# Altium PCB NB2DSK01.PcbDoc (part 14 of 17)
Units mil, origin at the board's own origin, x right, y up, seen from the top; angles counter-clockwise.
Board outline 11815 x 6500.03 mil, 8 copper layers (Top Layer, MidLayer1, MidLayer2, GND, PWR, MidLayer3, MidLayer4, Bottom Layer), stack 74.62 mil thick; 798 components, 1002 nets, 3927 pads, 3182 vias.
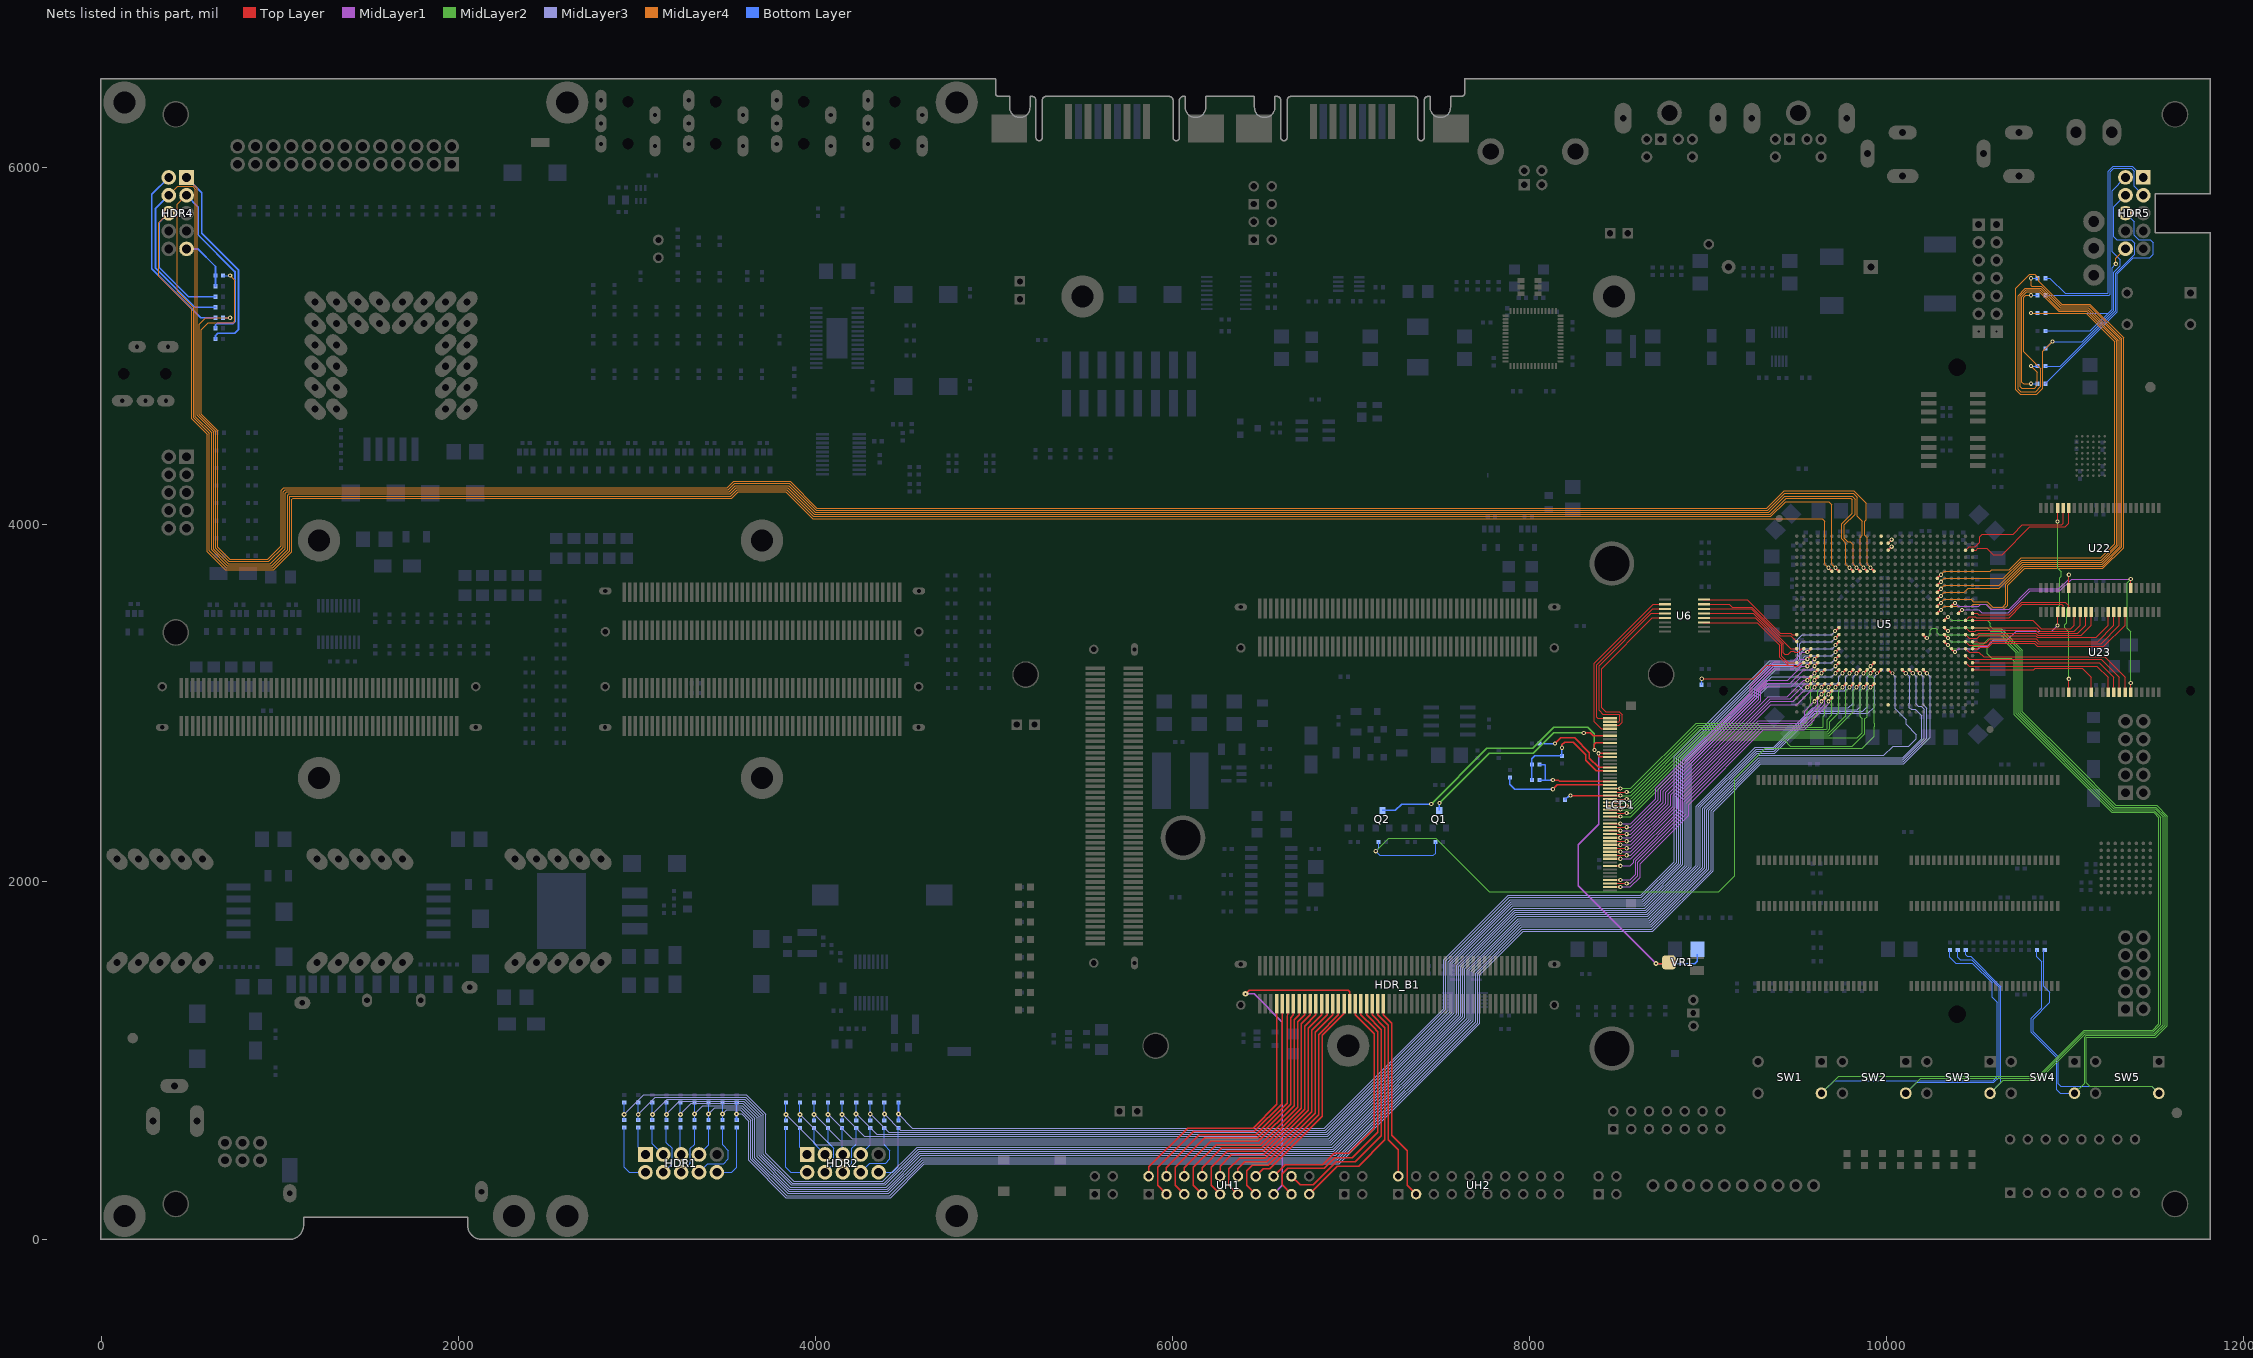
[diagram p20: the nets of this part, all layers, seen from the top]

## Via types
v1: diameter 23.62, hole 11.81, Top Layer to Bottom Layer, tented both sides, 1950 vias
v2: diameter 27.56, hole 11.81, Top Layer to Bottom Layer, tented both sides, 679 vias
v3: diameter 23.62, hole 11.81, Top Layer to Bottom Layer, 194 vias
v4: diameter 31.5, hole 11.81, Top Layer to Bottom Layer, tented both sides, 178 vias
v5: diameter 21.65, hole 11.81, Top Layer to Bottom Layer, tented both sides, 67 vias
v6: diameter 23.62, hole 11.81, Top Layer to Bottom Layer, tented bottom, 53 vias
v7: diameter 26, hole 11.81, Top Layer to Bottom Layer, tented both sides, 21 vias
v8: diameter 26, hole 11.81, Top Layer to Bottom Layer, 13 vias
v9: diameter 28, hole 11.81, Top Layer to Bottom Layer, 8 vias
v10: diameter 25.59, hole 11.81, Top Layer to Bottom Layer, tented both sides, 7 vias
v11: diameter 39.37, hole 11.81, Top Layer to Bottom Layer, tented both sides, 5 vias
v12: diameter 30, hole 11.81, Top Layer to Bottom Layer, 3 vias
v13: diameter 30, hole 11.81, Top Layer to Bottom Layer, tented both sides, 2 vias
v14: diameter 23, hole 11.81, Top Layer to Bottom Layer, tented both sides, 1 vias
v15: diameter 26.56, hole 11.81, Top Layer to Bottom Layer, tented both sides, 1 vias

## Nets (pads, with @x,y where several pads share a name; then routed paths per layer and width w, separated by ;. In a path a pad name is that pad's centre, name@x,y a point inside that pad or via, vN(x,y) a via of type N, cw(c..) or ccw(c..) an arc to the next point about the centre after c; other vN are vias at no path point) (continued)
SRAM.D19: U5.Y26 U23.10 | length 772.5
  Top Layer w5: U5.Y26@10480.32,3188.98 10543.31,3188.98 10562.99,3188.98 10822.83,3188.98 10830.71,3196.85 11094.49,3196.85 11145.67,3145.67 U23.10@11145.67,3062.99
SRAM.D20: U5.W25 U23.13 | length 916.1
  Top Layer w5: U5.W25@10440.95,3228.35 10460.63,3208.66 10543.31,3208.66 10562.99,3208.66 11177.17,3208.66 11240.16,3145.67 U23.13@11240.16,3062.99
SRAM.D21: U5.W26 U23.14 | length 908.3
  Top Layer w5: U5.W26@10480.32,3228.35 10543.31,3228.35 10562.99,3228.35 11188.98,3228.35 11271.66,3145.67 U23.14@11271.65,3062.99
SRAM.D22: U5.V25 U23.15 | length 997
  Top Layer w5: U5.V25@10440.95,3267.72 10462.5,3246.16 10541.44,3246.16 10543.31,3248.03 10562.99,3248.03 11200.79,3248.03 11303.15,3145.67 U23.15@11303.15,3062.99
SRAM.D23: U5.U25 U23.16 | length 1043.2
  Top Layer w5: U5.U25@10440.95,3307.09 10460.63,3287.4 10516.39,3287.4 10543.34,3260.45 11219.86,3260.45 11334.65,3145.67 U23.16@11334.65,3062.99
SRAM.D24: U5.U26 U23.29 | length 998.3
  Top Layer w5: U5.U26@10480.32,3307.09 10507.87,3307.09 10515.75,3314.96 10567.6,3314.96 10590.09,3337.45 10824.72,3337.45 10843.27,3318.9 11216.54,3318.9 11334.65,3437.01 U23.29@11334.65,3511.81
SRAM.D25: U5.T25 U23.30 | length 1001.4
  Top Layer w5: U5.T25@10440.95,3346.46 10460.63,3326.77 10543.31,3326.77 10562.99,3326.77 10565.27,3326.77 10585.95,3347.45 10832.44,3347.45 10845.24,3334.65 11200.79,3334.65 11303.15,3437.01 U23.30@11303.15,3511.81
SRAM.D26: U5.T26 U23.31 | length 922.6
  Top Layer w5: U5.T26@10480.32,3346.46 10507.87,3346.46 10515.75,3338.58 10543.31,3338.58 10556.81,3338.58 10579.68,3361.45 10837.06,3361.45 10852.06,3346.46 11181.1,3346.46 11271.65,3437.01 U23.31@11271.65,3511.81
SRAM.D27: U5.R25 U23.32 | length 918
  Top Layer w5: U5.R25@10440.95,3385.83 10460.63,3366.14 10507.87,3366.14 10519.69,3377.95 10543.31,3377.95 10562.99,3377.95 10834.65,3377.95 10842.52,3370.08 11173.23,3370.08 11240.16,3437.01 U23.32@11240.16,3511.81
SRAM.D28: U5.R26 U23.35 | length 771.1
  Top Layer w5: U5.R26@10480.32,3385.83 10507.87,3385.83 10515.75,3393.7 10543.31,3393.7 10562.99,3393.7 10834.65,3393.7 10846.46,3381.89 11090.55,3381.89 11145.67,3437.01 U23.35@11145.67,3511.81
SRAM.D29: U5.P25 U23.36 | length 782.3
  Top Layer w5: U5.P25@10440.95,3425.2 10460.63,3405.51 10496.06,3405.51 10500,3409.45 10543.31,3409.45 10562.99,3409.45 10834.65,3409.45 10850.39,3393.7 11070.87,3393.7 11114.17,3437.01 U23.36@11114.17,3511.81
SRAM.D30: U5.P26 U23.37 | length 698.4
  Top Layer w5: U5.P26@10480.32,3425.2 10543.31,3425.2 10562.99,3425.2 10838.58,3425.2 10858.27,3405.51 11051.18,3405.51 11082.68,3437.01 U23.37@11082.68,3511.81
SRAM.D31: U5.N26 U23.38 | length 673.4
  Top Layer w5: U5.N26@10480.32,3464.57 10543.31,3464.57 10562.99,3464.57 10818.9,3464.57 10866.14,3417.32 11031.5,3417.32 11051.18,3437.01 U23.38@11051.18,3511.81
SRAM.NBE0: U5.C26 U22.39 | length 717
  Top Layer w5: U5.C26@10480.32,3858.27 10500,3858.27 10510.81,3869.08 10560.78,3869.08 10595.86,3834 10647,3834 10801.19,3988.19 11000,3988.19 11019.69,4007.87 U22.39@11019.69,4094.49
SRAM.NBE1: U5.C25 U22.40 | length 714.3
  Top Layer w5: U5.C25@10440.95,3858.27 10460.63,3877.95 10496.06,3877.95 10519.69,3901.58 10519.69,3933.07 10535.43,3948.82 10543.31,3948.82 10562.99,3948.82 10708.66,3948.82 10759.84,4000 10980.32,4000 10988.19,4007.87 U22.40@10988.19,4094.49
SRAM.NBE2: U5.M26 U23.39 | length 615.6
  Top Layer w5: U5.M26@10480.32,3503.94 10507.87,3503.94 10515.75,3496.06 10543.31,3496.06 10562.99,3496.06 10685.04,3496.06 10755.91,3566.93 11000,3566.93 11019.69,3547.24 U23.39@11019.69,3511.81
SRAM.NBE3: U5.N25 U23.40 | length 626.7
  Top Layer w5: U5.N25@10440.95,3464.57 10460.63,3484.25 10496.06,3484.25 10500,3480.32 10543.31,3480.32 10562.99,3480.32 10685.04,3480.32 10759.84,3555.12 10980.32,3555.12 10988.19,3547.24 U23.40@10988.19,3511.81
SRAM.NCS: U5.L23 U22.6 U23.6 | length 1535.7
  Top Layer w5: U23.6@11019.69,3062.99 v1(11019.69,3137.8) ; U22.6@11019.69,3645.67 v1(11019.69,3720.47)
  Top Layer w7.87: U5.L23@10362.2,3543.31 v1(10381.89,3562.99)
  MidLayer1 w5: v1(10381.89,3562.99) 10401.58,3543.31 10515.75,3543.31 10527.56,3555.12 10543.31,3555.12 10555.12,3555.12 10582.68,3527.56 10685.04,3527.56 10799.21,3641.73 10964.57,3641.73 11019.69,3696.85 v1(11019.69,3720.47)
  MidLayer2 w5: v1(11019.69,3137.8) 11019.69,3401.58 10996.07,3425.2 10996.07,3440.95 11007.88,3452.76 11007.88,3531.5 11019.69,3543.31 v1(11019.69,3720.47)
SRAM.NOE: U5.U23 U22.41 U23.41 | length 1413.2
  Top Layer w5: v1(10956.7,3437.01) U23.41@10956.69,3511.81 ; v1(10956.69,4019.69) U22.41@10956.69,4094.49
  Top Layer w7.87: U5.U23@10362.2,3307.09 v1(10381.89,3287.4)
  MidLayer1 w5: v1(10381.89,3287.4) 10401.58,3307.09 10515.75,3307.09 ; 10515.75,3307.09 10527.56,3318.9 10543.31,3318.9 10562.99,3318.9 10600.55,3356.45 10675.35,3356.45 10724.41,3405.51 10925.2,3405.51 v1(10956.7,3437.01)
  MidLayer2 w5: v1(10956.7,3437.01) 10956.7,3539.37 10968.51,3551.18 10968.51,3704.73 10976.38,3712.6 10976.38,3736.22 10956.69,3755.91 v1(10956.69,4019.69)
SRAM.NWE: U5.M24 U22.17 U23.17 | length 1758.9
  Top Layer w5: U23.17@11366.14,3062.99 v1(11366.14,3114.17) ; U22.17@11366.14,3645.67 v1(11366.14,3696.85)
  Top Layer w7.87: U5.M24@10401.58,3503.94 v1(10421.26,3523.62)
  MidLayer1 w5: v1(10421.26,3523.62) 10515.75,3523.62 10531.5,3507.87 10543.31,3507.87 10562.99,3507.87 10681.1,3507.87 10803.15,3629.92 10968.5,3629.92 11035.43,3696.85 v1(11366.14,3696.85)
  MidLayer2 w5: v1(11366.14,3114.17) 11366.14,3401.58 11346.46,3421.26 11346.46,3677.17 v1(11366.14,3696.85)
SW0: R153.2 SW1.3 U5.T22 | length 6921.8
  Top Layer w7.87: U5.T22@10322.83,3346.46 v1(10342.52,3326.77)
  MidLayer2 w5: SW1.3@9633.86,816.93 9730.32,913.39 10847.1,913.39 11104.62,1170.9 11489.53,1170.9 11523.62,1204.99 11523.62,2359.91 11494.23,2389.3 11260.31,2389.3 10996.06,2653.54 10712.6,2937.01 10712.6,3237.5 10698.41,3251.68 10588.75,3251.68 10562.99,3277.44 10562.99,3318.9 10543.31,3318.9 10484.25,3318.9 10472.44,3307.09 10362.21,3307.09 v1(10342.52,3326.77)
  Bottom Layer w5: SW1.3@9633.86,816.93 9704.88,887.95 10596.31,887.95 10619.61,911.25 10619.61,1326 10590.5,1355.11 10590.5,1435.17 10479.65,1546.02 10385.98,1546.02 10353.41,1578.6 R153.2@10353.41,1618.11
SW1: R154.2 SW2.3 U5.R22 | length 6013
  Top Layer w7.87: U5.R22@10322.83,3385.83 v1(10342.52,3366.14)
  MidLayer2 w5: SW2.3@10106.3,816.93 10190.95,901.58 10849.44,901.58 11108.76,1160.9 11493.67,1160.9 11535.43,1202.66 11535.43,2362.24 11498.37,2399.3 11266.06,2399.3 10724.41,2940.95 10724.41,3283.47 10646.42,3361.45 10570.12,3361.45 10543.31,3334.65 10484.25,3334.65 10472.44,3346.46 10362.21,3346.46 v1(10342.52,3366.14)
  Bottom Layer w5: SW2.3@10106.3,816.93 10167.32,877.95 10600.45,877.95 10629.61,907.11 10629.61,1410.2 10474.7,1565.11 10410.89,1565.11 10397.7,1578.3 R154.2@10397.7,1618.11
SW2: R155.1 SW3.3 U5.R19 | length 5246.7
  Top Layer w7.87: U5.R19@10204.72,3385.83 v1(10224.41,3366.14)
  MidLayer2 w5: v1(10224.41,3366.14) 10244.09,3385.83 10244.09,3409.84 10255.91,3421.65 10274.02,3421.65 10283.07,3412.6 10283.07,3396.33 10293.58,3385.83 10543.31,3385.83 10562.99,3385.83 10637.8,3385.83 10736.22,3287.4 10736.22,2944.88 11019.69,2661.42 11271.8,2409.3 11502.52,2409.3 11547.24,2364.57 11547.24,1200.33 11497.82,1150.9 11112.9,1150.9 10851.77,889.77 10651.58,889.77 SW3.3@10578.74,816.93
  Bottom Layer w5: R155.1@10441.99,1618.11 10441.99,1593.01 10451,1584 10469.95,1584 10639.61,1414.35 10639.61,877.8 SW3.3@10578.74,816.93
SW3: R156.2 SW4.3 U5.P22 | length 4865
  Top Layer w7.87: U5.P22@10322.83,3425.2 v1(10342.52,3405.51)
  MidLayer2 w5: v1(10342.52,3405.51) 10362.21,3425.2 10543.31,3425.2 10562.99,3425.2 10582.68,3405.51 10637.8,3405.51 10748.03,3295.28 10748.03,2948.82 11277.55,2419.3 11506.66,2419.3 11559.06,2366.9 11559.06,1198 11501.96,1140.9 11117.04,1140.9 11108,1131.86 11108,873.75 SW4.3@11051.18,816.93
  Bottom Layer w5: R156.2@10840.61,1618.11 10840.61,1581.82 10869,1553.42 10869,1295.8 10809.21,1236.02 10809.21,1157.69 10950.94,1015.95 10950.94,836.19 10970.2,816.93 SW4.3@11051.18,816.93
SW4: R157.1 SW5.3 U5.N22 | length 5713.7
  Top Layer w7.87: U5.N22@10322.83,3464.57 v1(10342.52,3484.25)
  MidLayer2 w5: v1(10342.52,3484.25) 10362.21,3464.57 10543.31,3464.57 10562.99,3464.57 10578.74,3448.82 10578.74,3433.07 10594.49,3417.32 10641.73,3417.32 10759.84,3299.21 10759.84,2952.76 11043.31,2669.29 11283.3,2429.3 11510.8,2429.3 11570.87,2369.23 11570.87,1195.67 11506.1,1130.9 11121.18,1130.9 11118,1127.72 11118,877 11138,857 11483.55,857 SW5.3@11523.62,816.93
  Bottom Layer w5: R157.1@10884.9,1618.11 10879,1612.21 10879,1417 10914,1382 10914,1326.66 10819.21,1231.87 10819.21,1161.83 10960.94,1020.1 10960.94,870.06 10974,857 11483.55,857 SW5.3@11523.62,816.93
TALK#.MASTER.CNCT: HDR4.9 R296.2 R302.1 | length 313.1
  Bottom Layer w10: HDR4.9@477.95,5545.67 541.46,5545.67 640.24,5446.9 R302.1@640.24,5396.06 R296.2@640.24,5337.01
TALK#.MASTER.MODE: HDR4.6 R297.1 U5.F6 | length 12558.6
  Top Layer w7.87: v1(9673.23,3759.84) U5.F6@9692.91,3740.16
  MidLayer4 w5: HDR4.6@377.95,5745.67 323,5690.72 323,5392.13 508,5207.13 508,4593.52 594.49,4507.04 594.49,3849.56 696.01,3748.03 965.26,3748.03 1067.68,3850.45 1067.68,4142.45 1074.83,4149.61 3531.5,4149.61 3566.93,4185.04 3834.65,4185.04 3984.25,4035.43 9637.8,4035.43 9653.54,4019.69 9653.54,4000 9653.54,3779.53 v1(9673.23,3759.84)
  Bottom Layer w10: HDR4.6@377.95,5745.67 323.68,5691.4 323.68,5443.45 489.18,5277.95 R297.1@640.24,5277.95
TALK#.MASTER.TCK: HDR4.3 R299.1 U5.F7 | length 13017.8
  Top Layer w7.87: v1(9712.6,3759.84) U5.F7@9732.28,3740.16
  MidLayer4 w5: HDR4.3@477.95,5845.67 427,5794.72 427,5308.14 518,5217.14 518,4600.23 606.3,4511.93 606.3,3854.45 700.9,3759.84 960.07,3759.84 1055.68,3855.45 1055.68,4159.13 1057.97,4161.42 3526.6,4161.42 3562.04,4196.85 3839.54,4196.85 3989.14,4047.24 9350.39,4047.24 9433.07,4129.92 9675.05,4129.92 9692.91,4112.06 9692.91,4019.69 9692.91,4000 9692.91,3779.53 v1(9712.6,3759.84)
  Bottom Layer w10: HDR4.3@477.95,5845.67 543.68,5779.94 543.68,5623.45 748.68,5418.45 748.68,5138.45 738.68,5128.45 648.68,5128.45 640.24,5120.01 R299.1@640.24,5100.79
TALK#.MASTER.TDI: HDR4.1 R300.1 U5.F10 | length 13456.1
  Top Layer w7.87: v1(9830.71,3759.84) U5.F10@9850.39,3740.16
  MidLayer4 w5: HDR4.1@477.95,5945.67 539,5884.62 539,4612.63 629.92,4521.71 629.92,3864.23 710.69,3783.47 947.69,3783.47 1031.68,3867.45 1031.68,4176.45 1040.27,4185.04 3516.82,4185.04 3552.25,4220.47 3849.32,4220.47 3998.93,4070.87 9338.58,4070.87 9429.17,4161.45 9806.68,4161.45 9823.68,4144.45 9823.68,4060.35 9762.68,3999.35 9762.68,3925.45 9782.02,3906.12 9794.67,3906.12 9811.02,3889.76 9811.02,3779.53 v1(9830.71,3759.84)
  Bottom Layer w5: HDR4.1@473.62,5944.88 477.95,5944.88 478.74,5944.88 HDR4.1@483.07,5944.88
  Bottom Layer w10: HDR4.1@477.95,5945.67 478.74,5944.88 563.68,5859.94 563.68,5633.45 768.68,5428.45 768.68,5093.45 748.68,5073.45 653.68,5073.45 640.24,5060.01 R300.1@640.24,5041.73
TALK#.MASTER.TDO: HDR4.2 R301.1 | length 1026.3
  Bottom Layer w5: HDR4.2@377.95,5945.67 HDR4.2@383.07,5945.67
  Bottom Layer w10: HDR4.2@377.95,5945.67 283.68,5851.4 283.68,5433.45 557.29,5159.84 R301.1@640.24,5159.84
TALK#.MASTER.TMS: HDR4.4 R298.1 U5.F9 | length 13241.1
  Top Layer w7.87: v1(9791.34,3759.84) U5.F9@9811.02,3740.16
  MidLayer4 w5: HDR4.4@377.95,5845.67 429.28,5897 512,5897 528,5881 528,4606.93 618.11,4516.82 618.11,3859.34 705.8,3771.65 955.88,3771.65 1043.82,3859.59 1043.82,4166.59 1050.46,4173.23 3521.71,4173.23 3557.14,4208.66 3844.43,4208.66 3994.04,4059.06 9346.46,4059.06 9435.85,4148.45 9798.56,4148.45 9806.68,4140.33 9806.68,4064.45 9747.17,4004.94 9747.17,3922.43 9771.65,3897.94 9771.65,3779.53 v1(9791.34,3759.84)
  Bottom Layer w10: HDR4.4@377.95,5845.67 304.48,5772.2 304.48,5437.66 523.24,5218.9 R298.1@640.24,5218.9
TALK#.SLAVE.CNCT: HDR5.10 R303.2 R309.1 | length 1147.1
  MidLayer4 w5: v1(11283,5462) 11283,5492.06 HDR5.10@11337.01,5546.06
  Bottom Layer w5: R303.2@10887.76,5086 11140.61,5086 11261.68,5207.07 11261.68,5440.68 v1(11283,5462) ; R309.1@10887.76,5186 11240.61,5186
TALK#.SLAVE.MODE: HDR5.6 R308.2 | length 1362.5
  Bottom Layer w5: R308.2@10887.76,4790.72 11291.68,5194.64 11291.68,5406.4 11380.28,5495 11472,5495 11493,5516 11493,5579 11476,5596 11411,5596 11386,5621 11386,5697.07 HDR5.6@11337.01,5746.06
TALK#.SLAVE.TCK: HDR5.3 R306.1 | length 1359.3
  Bottom Layer w5: R306.1@10887.76,5286 11247,5286 11251.68,5290.68 11251.68,5977.6 11272.13,5998.04 11369.96,5998.04 11387,5981 11387,5896.07 HDR5.3@11437.01,5846.06 HDR5.3@11436.94,5846.06
TALK#.SLAVE.TDI: HDR5.1 R305.1 | length 1304.1
  Bottom Layer w5: R305.1@10887.76,5381.27 10913,5381.27 10998.28,5296 11237,5296 11241.68,5300.68 11241.68,5981.74 11267.98,6008.04 11375.03,6008.04 HDR5.1@11437.01,5946.06
TALK#.SLAVE.TDO: HDR5.2 R304.2 U5.M21 | length 5557.9
  Top Layer w7.87: U5.M21@10283.46,3503.94 v1(10303.15,3523.62)
  MidLayer4 w5: v1(10303.15,3523.62) 10322.84,3543.31 10472.44,3543.31 10484.25,3555.12 10543.31,3555.12 10559.06,3555.12 10586.61,3527.56 10653.54,3527.56 10677.17,3551.18 10677.17,3661.42 10771.65,3755.91 11210.66,3755.91 11327,3872.25 11327,5046.71 11137.71,5236 10979.57,5236 10852,5363.57 10852,5380.52 10830,5402.52 10800.52,5402.52 10723.55,5325.55 10723.55,4756.62 10748.2,4731.97 10838.97,4731.97 10872.2,4765.2 10872.2,4971.2 v1(10927.52,5026.52)
  Bottom Layer w5: R304.2@10887.76,4987.57 v1@10927.11,5026.92 ; v1(10927.52,5026.52) 11095.27,5026.52 11271.68,5202.93 11271.68,5414.68 11308.07,5451.07 11308.07,5483.93 11261.68,5530.32 11261.68,5870.74 HDR5.2@11337.01,5946.06
TALK#.SLAVE.TMS: HDR5.4 R307.2 | length 1336.2
  Bottom Layer w5: R307.2@10887.76,4889.15 10972.05,4889.15 11281.68,5198.78 11281.68,5410.54 11388,5516.86 11388,5578 11370,5596 11289,5596 11271.68,5613.32 11271.68,5780.74 HDR5.4@11337.01,5846.06
TALK.MASTER.CNCT: R302.2 U5.F12 | length 11934.9
  Top Layer w7.87: v1(9909.45,3759.84) U5.F12@9929.13,3740.16
  MidLayer4 w5: v1(722.36,5396.06) 748.6,5369.83 748.6,5139.73 741.9,5133.03 598.88,5133.03 559,5093.15 559,4620.92 653.54,4526.37 653.54,3874.02 720.47,3807.09 933.32,3807.09 1008.68,3882.45 1008.68,4194.01 1023.33,4208.66 3507.03,4208.66 3542.47,4244.1 3859.11,4244.1 4008.71,4094.49 9328.8,4094.49 9425.76,4191.45 9816.41,4191.45 9885.83,4122.03 9885.83,4027.56 9877.95,4019.69 9877.95,4000 9877.95,3940.95 9889.76,3929.13 9889.76,3779.53 v1(9909.45,3759.84)
  Bottom Layer w5: R302.2@682.6,5396.06 v1(722.36,5396.06)
TALK.MASTER.TDO: R301.2 U5.F11 | length 11663.6
  Top Layer w7.87: v1(9870.08,3759.84) U5.F11@9889.76,3740.16
  MidLayer4 w5: v1(722.36,5159.84) 585.86,5159.84 562.99,5136.97 549,5122.98 549,4616.78 641.73,4524.04 641.73,3869.12 715.58,3795.28 939.5,3795.28 1019.68,3875.45 1019.68,4185.45 1031.08,4196.85 3511.93,4196.85 3547.36,4232.28 3854.21,4232.28 4003.82,4082.68 9333.69,4082.68 9427.47,4176.45 9812.68,4176.45 9834.68,4154.45 9834.68,4047.21 9862.2,4019.69 9862.2,4000 9862.2,3940.95 9850.39,3929.13 9850.39,3779.53 v1(9870.08,3759.84)
  Bottom Layer w5: R301.2@682.6,5159.84 v1(722.36,5159.84)
TALK.SLAVE.CNCT: R309.2 U5.G21 | length 2778.9
  Top Layer w7.87: U5.G21@10283.46,3700.79 v1(10303.15,3720.47)
  MidLayer4 w5: v1(10303.15,3720.47) 10322.84,3740.16 10543.31,3740.16 10562.99,3740.16 10578.74,3740.16 10586.61,3748.03 10685.04,3748.03 10751.97,3814.96 11199,3814.96 11277,3892.96 11277,5026 11117,5186 v1(10808,5186)
  Bottom Layer w5: v1(10808,5186) R309.2@10845.4,5186
TALK.SLAVE.MODE: R308.1 U5.H21 | length 3465
  Top Layer w7.87: U5.H21@10283.46,3661.42 v1(10303.15,3681.1)
  MidLayer4 w5: v1(10303.15,3681.1) 10322.84,3700.79 10543.31,3700.79 10562.99,3700.79 10653.54,3700.79 10755.91,3803.15 11201.33,3803.15 11287,3888.82 11287,5030.14 11121.14,5196 10963,5196 10853,5306 10784.92,5306 10757.2,5278.29 10757.2,4799.84 10766.32,4790.72 v1(10808,4790.72)
  Bottom Layer w5: v1(10808,4790.72) R308.1@10845.4,4790.72
TALK.SLAVE.TCK: R306.2 U5.K21 | length 4302.2
  Top Layer w7.87: U5.K21@10283.46,3582.68 v1(10303.15,3602.36)
  MidLayer4 w5: v1(10303.15,3602.36) 10322.84,3622.05 10433.07,3622.05 10456.69,3645.67 10543.31,3645.67 10562.99,3645.67 10629.92,3645.67 10763.78,3779.53 11205.99,3779.53 11307,3880.54 11307,5038.43 11129.43,5216 10971.28,5216 10861.28,5326 10776.63,5326 10735.2,5284.57 10735.2,4760.97 10749.2,4746.97 10833.75,4746.97 10862.2,4775.43 10862.2,4874.72 10767.2,4969.72 10767.2,5274.14 10779.06,5286 v1(10808,5286)
  Bottom Layer w5: v1(10808,5286) R306.2@10845.4,5286
TALK.SLAVE.TDI: R305.2 U5.L21 | length 3149
  Top Layer w7.87: U5.L21@10283.46,3543.31 v1(10303.15,3562.99)
  MidLayer4 w5: v1(10303.15,3562.99) 10322.84,3582.68 10472.44,3582.68 10484.25,3570.87 10543.31,3570.87 10559.06,3570.87 10562.99,3570.87 10594.49,3539.37 10649.61,3539.37 10667.17,3556.93 10667.17,3667.17 10767.72,3767.72 11208.32,3767.72 11317,3876.39 11317,5042.57 11133.57,5226 10975.43,5226 10865.43,5336 10812,5336 10808,5340 v1(10808,5381.27)
  Bottom Layer w5: v1(10808,5381.27) R305.2@10845.4,5381.27
TALK.SLAVE.TMS: R307.1 U5.J21 | length 3728.3
  Top Layer w7.87: U5.J21@10283.46,3622.05 v1(10303.15,3641.73)
  MidLayer4 w5: v1(10303.15,3641.73) 10322.84,3661.42 10543.31,3661.42 10562.99,3661.42 10629.92,3661.42 10759.84,3791.34 11203.66,3791.34 11297,3884.68 11297,5034.28 11125.28,5206 10967.14,5206 10857.14,5316 10780.77,5316 10747.2,5282.43 10747.2,4773.32 10755.33,4765.19 10827.93,4765.19 10843.75,4781.01 10843.75,4853.4 v1(10808,4889.15)
  Bottom Layer w5: v1(10808,4889.15) R307.1@10845.4,4889.15
TFT#.BLUE0: LCD1.22 U5.AB12 | length 1951.6
  Top Layer w5: LCD1.22@8448.82,2366.14 v1(8507.87,2366.14)
  Top Layer w7.87: v1(9909.45,3090.55) U5.AB12@9929.13,3110.24
  MidLayer2 w5: v1(8507.87,2366.14) 8566.93,2366.14 8996.06,2795.28 9425.2,2795.28 9460.63,2759.84 9807.09,2759.84 9877.95,2830.71 9877.95,2870.08 9877.95,2889.76 9877.95,2913.39 9889.76,2925.2 9889.76,3070.87 v1(9909.45,3090.55)
TFT#.BLUE1: LCD1.23 U5.AB11 | length 1895.8
  Top Layer w5: LCD1.23@8448.82,2385.83 v1(8543.31,2385.83)
  Top Layer w7.87: v1(9870.08,3090.55) U5.AB11@9889.76,3110.24
  MidLayer2 w5: v1(8543.31,2385.83) 8566.93,2385.83 8988.19,2807.09 9834.09,2807.09 9862.2,2835.2 9862.2,2913.39 9850.39,2925.2 9850.39,3070.87 v1(9870.08,3090.55)
TFT#.BLUE2: LCD1.24 U5.AB10 | length 1790.5
  Top Layer w5: LCD1.24@8448.82,2405.51 v1(8507.87,2405.51)
  Top Layer w7.87: v1(9830.71,3090.55) U5.AB10@9850.39,3110.24
  MidLayer2 w5: v1(8507.87,2405.51) 8566.93,2405.51 8594.49,2433.07 ; 8574.8,2413.39 8980.32,2818.9 9677.17,2818.9 9811.02,2952.76 9811.02,3070.87 v1(9830.71,3090.55)
TFT#.BLUE3: LCD1.25 U5.AB9 | length 1727.6
  Top Layer w5: LCD1.25@8448.82,2425.2 v1(8543.31,2425.2)
  Top Layer w7.87: v1(9791.34,3090.55) U5.AB9@9811.02,3110.24
  MidLayer2 w5: v1(8543.31,2425.2) 8566.93,2425.2 8972.44,2830.71 9670.94,2830.71 9771.65,2931.42 9771.65,3070.87 v1(9791.34,3090.55)
TFT#.BLUE4: LCD1.26 U5.AB8 | length 1693
  Top Layer w5: LCD1.26@8448.82,2444.88 v1(8507.87,2444.88)
  Top Layer w7.87: v1(9751.97,3090.55) U5.AB8@9771.65,3110.24
  MidLayer2 w5: v1(8507.87,2444.88) 8566.93,2444.88 8964.57,2842.52 9665.35,2842.52 9681.1,2858.27 9681.1,2870.08 9681.1,2889.76 9681.1,2897.64 9732.28,2948.82 9732.28,3070.87 v1(9751.97,3090.55)
TFT#.CL1: LCD1.29 U5.AB5 | length 1545.8
  Top Layer w5: LCD1.29@8448.82,2503.94 v1(8543.31,2503.94)
  Top Layer w7.87: v1(9633.86,3090.55) U5.AB5@9653.54,3110.24
  MidLayer2 w5: v1(8543.31,2503.94) 8566.93,2503.94 8940.95,2877.95 9574.8,2877.95 9582.68,2885.83 9582.68,2901.58 9582.68,2913.39 9614.17,2944.88 9614.17,3070.87 v1(9633.86,3090.55)
TFT#.CL2: LCD1.30 U5.Y5 | length 1611.8
  Top Layer w5: LCD1.30@8448.82,2523.62 v1(8507.87,2523.62)
  Top Layer w7.87: v1(9633.86,3169.29) U5.Y5@9653.54,3188.98
  MidLayer2 w5: v1(8507.87,2523.62) 8566.93,2523.62 8933.07,2889.76 9547.24,2889.76 9555.12,2897.64 9555.12,2913.39 9555.12,2976.38 9574.8,2996.06 9574.8,3141.73 9582.68,3149.61 9614.17,3149.61 v1(9633.86,3169.29)
TFT#.CL3: LCD1.3 U5.AC6 | length 1797
  Top Layer w5: LCD1.3@8448.82,1992.13 v1(8543.31,1992.13)
  Top Layer w7.87: v1(9673.23,3051.18) U5.AC6@9692.91,3070.87
  MidLayer1 w5: v1(8543.31,1992.13) 8562.99,1992.13 8606.3,2035.43 8606.3,2110.24 8877.95,2381.89 8877.95,2440.95 9300.46,2863.45 9532.74,2863.45 9582.68,2913.39 9582.68,2925.2 9653.54,2996.06 9653.54,3031.5 v1(9673.23,3051.18)
TFT#.DISP_ON: LCD1.2 U5.AD6 | length 1774.8
  Top Layer w5: LCD1.2@8448.82,1972.44 v1(8507.87,1972.44)
  Top Layer w7.87: v1(9673.23,3011.81) U5.AD6@9692.91,3031.5
  MidLayer1 w5: v1(8507.87,1972.44) 8562.99,1972.44 8618.11,2027.56 8618.11,2102.36 8889.76,2374.02 8889.76,2433.07 9309.15,2852.45 9537.12,2852.45 9594.49,2909.82 9594.49,2917.32 9673.23,2996.06 v1(9673.23,3011.81)
TFT#.GREEN0: LCD1.15 U5.Y4 | length 1627.8
  Top Layer w5: LCD1.15@8448.82,2228.35 v1(8543.31,2228.35)
  Top Layer w7.87: v1(9594.49,3169.29) U5.Y4@9614.17,3188.98
  MidLayer1 w5: v1(8543.31,2228.35) 8566.93,2228.35 8775.03,2436.45 8775.03,2495.5 9283.46,3003.94 9295.28,3015.75 9295.28,3066.93 9322.83,3094.49 9413.39,3094.49 9433.07,3094.49 9464.57,3094.49 9519.69,3149.61 9574.8,3149.61 v1(9594.49,3169.29)
TFT#.GREEN1: LCD1.16 U5.W4 | length 1633.7
  Top Layer w5: LCD1.16@8448.82,2248.03 v1(8507.87,2248.03)
  Top Layer w7.87: v1(9594.49,3208.66) U5.W4@9614.17,3228.35
  MidLayer1 w5: v1(8507.87,2248.03) 8566.93,2248.03 8761.11,2442.21 8761.11,2501.27 9283.46,3023.62 9283.46,3070.87 9326.77,3114.17 9413.39,3114.17 9433.07,3114.17 9460.63,3114.17 9535.43,3188.98 9574.8,3188.98 v1(9594.49,3208.66)
TFT#.GREEN2: LCD1.17 U5.W3 | length 1583.9
  Top Layer w5: LCD1.17@8448.82,2267.72 v1(8543.31,2267.72)
  Top Layer w7.87: v1(9555.12,3208.66) U5.W3@9574.8,3228.35
  MidLayer1 w5: v1(8543.31,2267.72) 8566.93,2267.72 8747.19,2447.98 8747.19,2507.04 9271.65,3031.5 9271.65,3074.8 9326.77,3129.92 9413.39,3129.92 9433.07,3129.92 9444.88,3129.92 9523.62,3208.66 v1(9555.12,3208.66)
TFT#.GREEN3: LCD1.18 U5.V4 | length 1631.4
  Top Layer w5: LCD1.18@8448.82,2287.4 v1(8507.87,2287.4)
  Top Layer w7.87: v1(9594.49,3248.03) U5.V4@9614.17,3267.72
  MidLayer1 w5: v1(8507.87,2287.4) 8566.93,2287.4 8733.27,2453.75 8733.27,2512.8 9259.84,3039.37 9259.84,3082.68 9370.08,3192.91 9413.39,3192.91 9433.07,3192.91 9480.32,3192.91 9515.75,3228.35 9574.8,3228.35 v1(9594.49,3248.03)
TFT#.GREEN4: LCD1.19 U5.V3 | length 1583.9
  Top Layer w5: LCD1.19@8448.82,2307.09 v1(8543.31,2307.09)
  Top Layer w7.87: v1(9555.12,3248.03) U5.V3@9574.8,3267.72
  MidLayer1 w5: v1(8543.31,2307.09) 8566.93,2307.09 8719.35,2459.51 8719.35,2518.57 9248.03,3047.24 9248.03,3090.55 9370.08,3212.6 9417.32,3212.6 9433.07,3212.6 9476.38,3212.6 9511.81,3248.03 v1(9555.12,3248.03)
TFT#.GREEN5: LCD1.20 U5.U3 | length 1592
  Top Layer w5: LCD1.20@8448.82,2326.77 v1(8507.87,2326.77)
  Top Layer w7.87: v1(9555.12,3287.4) U5.U3@9574.8,3307.09
  MidLayer1 w5: v1(8507.87,2326.77) 8566.93,2326.77 8705.43,2465.28 8705.43,2524.33 9236.22,3055.12 9236.22,3098.43 9371.25,3233.45 9474.02,3233.45 9527.97,3287.4 v1(9555.12,3287.4)
TFT#.LED_C_L: LCD1.45 Q1.3 | length 1164.8
  Top Layer w7.87: v1(8303.15,2834.65) 8340.55,2834.65 8356.3,2818.9 LCD1.45@8448.82,2818.9
  MidLayer2 w7.87: v1(7494.42,2442.2) 7772.69,2720.47 8021.14,2720.47 8135.31,2834.65 v1(8303.15,2834.65)
  Bottom Layer w7.87: Q1.3@7494.42,2400.86 v1(7494.42,2442.2)
TFT#.LED_C_R: LCD1.43 Q2.3 | length 1607.4
  Top Layer w7.87: v1(8362.9,2739.4) 8362.9,2772.2 8370.23,2779.53 LCD1.43@8448.82,2779.53
  MidLayer2 w7.87: v1(7449.14,2436.29) 7760.88,2748.03 8016.26,2748.03 8134.37,2866.14 8326.77,2866.14 8362.9,2830.01 v1(8362.9,2739.4)
  Bottom Layer w7.87: Q2.3@7175.52,2400.86 7248.35,2400.86 7283.79,2436.29 v1(7449.14,2436.29)
TFT#.M: C118.1 LCD1.28 U5.AB6 | length 1877.7
  Top Layer w5: LCD1.28@8448.82,2484.25 v1(8507.87,2484.25)
  Top Layer w7.87: v1(8228.35,2484.25) LCD1.28@8448.82,2484.25 ; v1(9673.23,3090.55) U5.AB6@9692.91,3110.24
  MidLayer2 w5: v1(8507.87,2484.25) 8566.93,2484.25 8948.82,2866.14 9641.73,2866.14 9645.67,2870.08 9645.67,2889.76 9645.67,2929.13 9653.54,2937.01 9653.54,3070.87 v1(9673.23,3090.55)
  Bottom Layer w5: C118.1@8197.83,2460.63 C118.1@8197.83,2461.61
  Bottom Layer w7.87: C118.1@8197.83,2461.61 8220.47,2484.25 v1(8228.35,2484.25)
TFT#.POL: LCD1.27 U5.AB7 | length 1659.3
  Top Layer w5: LCD1.27@8448.82,2464.57 v1(8543.31,2464.57)
  Top Layer w7.87: v1(9712.6,3090.55) U5.AB7@9732.28,3110.24
  MidLayer2 w5: v1(8543.31,2464.57) 8566.93,2464.57 8956.69,2854.33 9661.42,2854.33 9665.35,2858.27 9665.35,2870.08 9665.35,2889.76 9665.35,2909.45 9692.91,2937.01 9692.91,3070.87 v1(9712.6,3090.55)
TFT#.RED0: LCD1.10 U5.AD4 | length 1591.8
  Top Layer w5: LCD1.10@8448.82,2129.92 v1(8507.87,2129.92)
  Top Layer w7.87: v1(9594.49,3011.81) U5.AD4@9614.17,3031.5
  MidLayer1 w5: v1(8507.87,2129.92) 8566.93,2129.92 8842.52,2405.51 8842.52,2464.57 9281.61,2903.66 9517.83,2903.66 9539.37,2925.2 9539.37,2956.69 v1(9594.49,3011.81)
TFT#.RED1: LCD1.11 U5.AB4 | length 1597.9
  Top Layer w5: LCD1.11@8448.82,2149.61 v1(8543.31,2149.61)
  Top Layer w7.87: v1(9594.49,3090.55) U5.AB4@9614.17,3110.24
  MidLayer1 w5: v1(8543.31,2149.61) 8566.93,2149.61 8830.71,2413.39 8830.71,2472.44 9350.39,2992.13 9413.39,2992.13 9433.07,2992.13 9496.06,2992.13 v1(9594.49,3090.55)
TFT#.RED2: LCD1.12 U5.AB3 | length 1550.3
  Top Layer w5: LCD1.12@8448.82,2169.29 v1(8507.87,2169.29)
  Top Layer w7.87: v1(9555.12,3090.55) U5.AB3@9574.8,3110.24
  MidLayer1 w5: v1(8507.87,2169.29) 8566.93,2169.29 8816.79,2419.15 8816.79,2478.21 9350.39,3011.81 9413.39,3011.81 9433.07,3011.81 9476.38,3011.81 v1(9555.12,3090.55)
TFT#.RED3: LCD1.13 U5.AA4 | length 1597.9
  Top Layer w5: LCD1.13@8448.82,2188.98 v1(8543.31,2188.98)
  Top Layer w7.87: v1(9594.49,3129.92) U5.AA4@9614.17,3149.61
  MidLayer1 w5: v1(8543.31,2188.98) 8566.93,2188.98 8802.87,2424.92 8802.87,2483.97 9346.46,3027.56 9417.32,3027.56 9433.07,3027.56 9460.63,3027.56 9543.31,3110.24 9574.8,3110.24 v1(9594.49,3129.92)
TFT#.RED4: LCD1.14 U5.AA3 | length 1550.3
  Top Layer w5: LCD1.14@8448.82,2208.66 v1(8507.87,2208.66)
  Top Layer w7.87: v1(9555.12,3129.92) U5.AA3@9574.8,3149.61
  MidLayer1 w5: v1(8507.87,2208.66) 8566.93,2208.66 8788.95,2430.68 8788.95,2489.74 9336.77,3037.56 9443.07,3037.56 9535.43,3129.92 v1(9555.12,3129.92)
TFT#.STH: LCD1.8 U5.AC5 | length 1682.3
  Top Layer w5: LCD1.8@8448.82,2090.55 v1(8507.87,2090.55)
  Top Layer w7.87: v1(9633.86,3051.18) U5.AC5@9653.54,3070.87
  MidLayer1 w5: v1(8507.87,2090.55) 8562.99,2090.55 8582.68,2110.24 8582.68,2125.99 8854.33,2397.64 8854.33,2456.69 9287.09,2889.45 9519.37,2889.45 9555.12,2925.2 9555.12,2937.01 9614.17,2996.06 9614.17,3031.5 v1(9633.86,3051.18)
TFT#.STV: LCD1.4 U5.AD5 | length 1721.6
  Top Layer w5: LCD1.4@8448.82,2011.81 v1(8507.87,2011.81)
  Top Layer w7.87: v1(9633.86,3011.81) U5.AD5@9653.54,3031.5
  MidLayer1 w5: v1(8507.87,2011.81) 8562.99,2011.81 8594.49,2043.31 8594.49,2118.11 8866.14,2389.76 8866.14,2448.82 9292.78,2875.45 9525.06,2875.45 9570.87,2921.26 9570.87,2933.07 9633.86,2996.06 v1(9633.86,3011.81)
TFT#.V0: LCD1.31 R43.1 | length 618.1
  Top Layer w7.87: v1(8129.92,2519.69) 8153.54,2543.31 LCD1.31@8448.82,2543.31
  Bottom Layer w7.87: R43.1@7889.76,2585.12 7889.76,2547.24 7917.32,2519.69 v1(8129.92,2519.69)
TFT#.V4: LCD1.32 R45.2 R46.2 | length 514.2
  Top Layer w7.87: v1(8129.92,2570.87) 8161.42,2570.87 8169.29,2562.99 LCD1.32@8448.82,2562.99
  Bottom Layer w7.87: R46.2@8054.65,2570.87 v1(8129.92,2570.87) ; R45.2@8054.65,2657.48 8085.72,2657.48 8087.17,2656.03 8087.17,2572.36
TFT#.V5: C115.1 LCD1.35 R45.1 R46.1 | length 713.8
  Top Layer w7.87: v1(8181.1,2751.97) 8181.1,2767.72 8196.85,2783.47 8244.09,2783.47 8314.96,2712.6 8314.96,2681.1 8374.02,2622.05 LCD1.35@8448.82,2622.05
  Bottom Layer w7.87: R46.1@8012.28,2570.87 R45.1@8012.28,2657.48 ; R45.1@8012.28,2658.71 8012.28,2690.05 8027.95,2705.71 C115.1@8181.1,2705.71 ; C115.1@8181.1,2706.69 v1(8181.1,2751.97)
TFT#.V9: LCD1.36 R44.2 | length 487
  Top Layer w7.87: v1(8141.73,2775.59) 8173.23,2807.09 8251.97,2807.09 8334.65,2724.41 8334.65,2692.91 8385.83,2641.73 LCD1.36@8448.82,2641.73
  Bottom Layer w7.87: R44.2@8061.81,2775.59 v1(8141.73,2775.59)
TFT#.VCOM: C114.1 LCD1.39 LCD1.40 VR1.2 | length 1897.6
  Top Layer w7.87: LCD1.39@8448.82,2700.79 8389.13,2700.79 8385.83,2704.09 v1(8385.83,2720.47) LCD1.40@8448.82,2720.47 ; v2(8708.66,1543.31) 8773.37,1543.31 VR1.2@8779.53,1549.47
  MidLayer1 w7.87: v1(8385.83,2720.47) 8385.83,2322.84 8271.65,2208.66 8271.65,1980.32 v2(8708.66,1543.31)
  Bottom Layer w7.87: v2(8708.66,1543.31) 8925.31,1543.31 8939.29,1557.29 C114.1@8939.29,1595.83
TFT#.X_MINUS: LCD1.49 U6.4 | length 960.7
  Top Layer w5: LCD1.49@8448.82,2897.64 8501.66,2897.64 8505.79,2901.76 8505.79,2934.21 8500,2940 8410,2940 8388.68,2961.32 8388.68,3212.45 8680.52,3504.29 U6.4@8757.87,3504.29
TFT#.X_PLUS: LCD1.47 U6.2 | length 964.4
  Top Layer w5: LCD1.47@8448.82,2858.27 8399.61,2858.27 8361.68,2896.2 8361.68,3224.45 8692.7,3555.47 U6.2@8757.87,3555.47
TFT#.Y_MINUS: LCD1.48 U6.5 | length 942.6
  Top Layer w5: LCD1.48@8448.82,2877.95 8503.18,2877.95 8518.68,2893.45 8518.68,2937.07 8502.3,2953.45 8425.68,2953.45 8402.68,2976.45 8402.68,3193.45 8687.93,3478.7 U6.5@8757.87,3478.7
TFT#.Y_PLUS: LCD1.50 U6.3 | length 880.4
  Top Layer w5: LCD1.50@8448.82,2917.32 8382.68,2917.32 8376.1,2923.9 8376.1,3217.88 8688.11,3529.88 U6.3@8757.87,3529.88
TFT.BLIGHT: R48.1 R49.1 U5.W12 | length 4549.9
  Top Layer w7.87: v1(9909.45,3208.66) U5.W12@9929.13,3228.35
  MidLayer2 w5: v1(7138.12,2172.51) 7209.6,2244 7475,2244 7774.12,1944.88 9059.06,1944.88 9149.61,2035.43 9149.61,2578.74 9318.9,2748.03 9862.2,2748.03 9929.13,2814.96 9929.13,2870.08 9929.13,2889.77 9929.13,3138.19 9917.72,3149.61 9900,3149.61 9889.76,3159.84 9889.76,3188.98 v1(9909.45,3208.66)
  Bottom Layer w5: R49.1@7154.34,2223.69 7154.34,2188.73 v1(7138.12,2172.51) 7161.74,2148.89 7460.88,2148.89 7473.23,2161.24 R48.1@7473.23,2223.69
TFT.IRQ: R47.1 U5.W2 U6.11 | length 1257.6
  Top Layer w5: v1(8963.71,3138.47) 9254.25,3138.47 9268.24,3152.46 9328.38,3212.6 9476.38,3212.6 9480.32,3208.66 9503.94,3208.66 9523.62,3228.35 U5.W2@9535.43,3228.35 ; U6.11@8976.38,3453.11 9274.33,3453.11 9401,3326.44 9401,3259.6 9448,3212.6
  Bottom Layer w5: R47.1@8962.56,3104.06 8962.88,3104.91 R47.1@8963.04,3105.33 ; R47.1@8963.04,3104.85 R47.1@8963.04,3105.33 ; v1(8963.71,3138.47) R47.1@8963.04,3105.33
TFT_SPI.BUSY: U5.U2 U6.13 | length 699.5
  Top Layer w5: U6.13@8976.38,3504.29 9251.43,3504.29 9421,3334.72 9421,3284.59 9430,3275.59 9448.14,3275.59 9463.89,3291.34 9480.32,3291.34 9484.25,3287.4 9503.94,3287.4 9523.62,3307.09 U5.U2@9535.43,3307.09
TFT_SPI.CLK: U5.R1 U6.16 | length 600.6
  Top Layer w5: U6.16@8976.38,3581.06 8976.65,3580.79 9217.36,3580.79 9404.69,3393.45 9463.21,3393.45 9470.84,3385.83 U5.R1@9496.06,3385.83
TFT_SPI.CS_N: U5.T1 U6.15 | length 606.3
  Top Layer w5: U6.15@8976.38,3555.47 9118.41,3555.47 9134,3539.88 9244.12,3539.88 9403.55,3380.45 9462.07,3380.45 U5.T1@9496.06,3346.46
TFT_SPI.DIN: U5.U1 U6.14 | length 612
  Top Layer w5: U6.14@8976.38,3529.88 9239.98,3529.88 9462.77,3307.09 U5.U1@9496.06,3307.09
TFT_SPI.DOUT: U5.W1 U6.12 | length 662.2
  Top Layer w5: U6.12@8976.38,3478.7 9262.88,3478.7 9411,3330.58 9411,3264.35 9447,3228.35 U5.W1@9496.06,3228.35
UBA#.DETECT: HDR1.10 R261.2 | length 345.4
  Bottom Layer w5: HDR1.10@3448.03,374.02 3531.5,374.02 3559.06,401.58 R261.2@3559.06,624.49
UBA#.HARD.TCK: HDR1.3 R251.2 | length 175.9
  Bottom Layer w5: R251.2@3086.61,624.49 3086.61,535.43 HDR1.3@3148.03,474.02
UBA#.HARD.TDI: HDR1.1 R248.2 | length 167.1
  Bottom Layer w5: R248.2@3007.87,624.49 3007.87,514.17 HDR1.1@3048.03,474.02
UBA#.HARD.TDO: HDR1.2 R249.2 | length 353.2
  Bottom Layer w5: R249.2@2929.13,624.49 2929.13,401.58 2956.69,374.02 HDR1.2@3048.03,374.02
UBA#.HARD.TMS: HDR1.4 R250.2 | length 283.7
  Bottom Layer w5: HDR1.4@3148.03,374.02 3196.85,422.83 3196.85,507.87 3165.35,539.37 R250.2@3165.35,624.49
UBA#.SOFT.TCK: HDR1.7 R259.2 | length 172.7
  Bottom Layer w5: HDR1.7@3348.03,474.02 3401.57,527.56 R259.2@3401.57,624.49
UBA#.SOFT.TDI: HDR1.5 R256.2 | length 152.1
  Bottom Layer w5: R256.2@3244.09,624.49 3244.09,477.95 HDR1.5@3248.03,474.02
UBA#.SOFT.TDO: HDR1.6 R257.2 | length 281.5
  Bottom Layer w5: HDR1.6@3248.03,374.02 3299.21,425.2 3299.21,507.87 3322.83,531.5 R257.2@3322.83,624.49
UBA#.SOFT.TMS: HDR1.8 R258.2 | length 383.5
  Bottom Layer w5: HDR1.8@3348.03,374.02 3397.02,423 3485.99,423 3511.81,448.82 3511.81,496.06 3480.32,527.56 R258.2@3480.32,624.49
UBA.DETECT: R260.1 R261.1 U5.Y19 | length 8921.5
  Top Layer w7.87: U5.Y19@10204.72,3188.98 v1(10224.41,3169.29)
  MidLayer3 w5: v2(3559.06,700.79) 3586.57,700.79 3625.95,661.42 3625.95,441.22 3834.88,232.28 4421.03,232.28 4610,421.26 6933.56,421.26 7720.47,1208.17 7720.47,1480.32 7964.57,1724.41 8688.98,1724.41 9027.56,2062.99 9027.56,2393.7 9295.28,2661.42 10095.28,2661.42 10244.09,2810.24 10244.09,2889.76 10244.1,3149.6 v1(10224.41,3169.29)
  Bottom Layer w11.81: R261.1@3559.06,666.85 v2(3559.06,700.79) R260.1@3559.06,764.25
UBA.HARD.TCK: R247.1 R251.1 U5.Y12 | length 8950.6
  Top Layer w7.87: v1(9909.45,3169.29) U5.Y12@9929.13,3188.98
  MidLayer3 w5: v2(3086.61,698.82) 3171.26,783.47 3604.12,783.47 3696.81,690.77 ; 3696.85,690.77 3696.85,470.53 3864.23,303.15 4391.67,303.15 4580.65,492.13 6904.21,492.13 7649.61,1237.52 7649.61,1509.67 7935.21,1795.28 8665.35,1795.28 8956.69,2086.61 8956.69,2417.32 9271.65,2732.28 9370.57,2732.28 9593.28,2955 9864.44,2955 9889.76,2980.32 9889.76,3149.6 v1(9909.45,3169.29)
  Bottom Layer w5: R251.1@3086.61,666.85 v2(3086.61,698.82) R247.1@3086.61,764.25
UBA.HARD.TDI: R244.1 R248.1 U5.Y11 | length 8992.7
  Top Layer w7.87: v1(9870.08,3169.29) U5.Y11@9889.76,3188.98
  MidLayer3 w5: v2(3007.87,698.82) 3104.33,795.28 3609.01,795.28 3708.62,695.66 3708.66,475.42 3870.94,313.15 4384.97,313.15 4575.76,503.94 6899.32,503.94 7637.8,1242.42 7637.8,1514.56 7930.32,1807.09 8661.42,1807.09 8944.88,2090.55 8944.88,2421.26 9267.72,2744.1 9368.24,2744.1 9589.14,2965 9835.07,2965 9850.39,2980.32 9850.39,3000 9850.39,3153.54 v1(9870.08,3169.29)
  Bottom Layer w5: R248.1@3007.87,666.85 v2(3007.87,698.82) R244.1@3007.87,764.25
UBA.HARD.TDO: R245.1 R249.1 U5.Y10 | length 9020.3
  Top Layer w7.87: v1(9830.71,3169.29) U5.Y10@9850.39,3188.98
  MidLayer3 w5: v2(2929.13,698.82) 3037.4,807.09 3613.9,807.09 3720.43,700.56 3720.43,480.36 3826.97,373.82 3877.64,323.15 4378.27,323.15 4570.87,515.75 6894.42,515.75 7625.98,1247.31 7625.98,1519.45 7925.43,1818.9 8657.48,1818.9 8933.07,2094.49 8933.07,2425.2 9263.78,2755.91 9365.91,2755.91 9585,2975 9785.12,2975 9811.02,3000.91 9811.02,3149.61 v1(9830.71,3169.29)
  Bottom Layer w5: R249.1@2929.13,666.85 v2(2929.13,698.82) R245.1@2929.13,764.25
UBA.HARD.TMS: R246.1 R250.1 U5.Y13 | length 8911.8
  Top Layer w7.87: v5@9948.82,3169.29 U5.Y13@9968.5,3188.98
  MidLayer3 w5: v2(3165.35,698.82) 3238.19,771.65 3599.23,771.65 3685,685.88 3685,465.68 3859.34,291.34 4396.57,291.34 4585.54,480.32 6909.1,480.32 7661.42,1232.63 7661.42,1504.78 7940.11,1783.47 8669.29,1783.47 8968.5,2082.68 8968.5,2413.39 9275.59,2720.47 9372.9,2720.47 9597.43,2945 9894.75,2945 9929.13,2979.39 9929.13,2998.31 9929.13,3149.6 9946.85,3167.32 v5@9948.82,3169.29
  Bottom Layer w5: R250.1@3165.35,666.85 v2(3165.35,698.82) R246.1@3165.35,764.25
  other v5: 9944.88,3169.29
UBA.SOFT.TCK: R255.1 R259.1 U5.Y17 | length 9085.2
  Top Layer w7.87: U5.Y17@10125.98,3188.98 v1(10145.67,3169.29)
  MidLayer3 w5: v2(3401.57,700.79) 3437,736.22 3584.55,736.22 3649.57,671.2 3649.57,451 3844.66,255.91 4411.24,255.91 4600.22,444.88 6923.78,444.88 7696.85,1217.95 7696.85,1490.1 7954.78,1748.03 8681.1,1748.03 9003.94,2070.87 9003.94,2401.58 9287.4,2685.04 10090.61,2685.04 10209.68,2804.11 10209.68,2966.82 10192.25,2984.25 10177,2984.25 10165.35,2995.9 10165.35,3149.61 v1(10145.67,3169.29)
  Bottom Layer w5: R259.1@3401.57,666.85 R255.1@3401.57,764.25
UBA.SOFT.TDI: R252.1 R256.1 U5.Y14 | length 9222.5
  Top Layer w7.87: U5.Y14@10007.87,3188.98 v5@10027.56,3169.29
  MidLayer3 w5: v2@3244.09,698.82 3305.11,759.84 3594.33,759.84 3673.19,680.99 3673.19,460.79 3854.45,279.53 4401.46,279.53 4590.44,468.5 6913.99,468.5 7673.23,1227.74 7673.23,1499.88 7945,1771.65 8673.23,1771.65 8980.32,2078.74 8980.32,2409.45 9279.53,2708.66 9984.25,2708.66 10035.68,2760.09 10123.24,2760.09 10166,2802.85 10166,2826 10109,2883 10109,2909.78 10047.24,2971.53 10047.25,3149.6 10029.53,3167.32 v5@10027.56,3169.29
  Bottom Layer w5: R256.1@3244.09,666.85 v2(3244.09,698.82) R252.1@3244.09,764.25
  other v5: 10031.5,3169.29
UBA.SOFT.TDO: R253.1 R257.1 U5.Y16 | length 9165.6
  Top Layer w7.87: U5.Y16@10086.61,3188.98 v1(10106.3,3169.29)
  MidLayer3 w5: v2(3322.83,700.79) 3370.08,748.03 3589.44,748.03 3661.38,676.09 3661.42,455.85 3849.55,267.72 4406.35,267.72 4595.33,456.69 6918.89,456.69 7685.04,1222.85 7685.04,1494.99 7949.89,1759.84 8677.17,1759.84 8992.13,2074.8 8992.13,2405.51 9283.46,2696.85 10088.28,2696.85 10194.82,2803.39 10194.82,2931.31 10159.13,2967 10136,2967 10125.99,2977.01 10125.99,3000 10125.98,3153.54 v1(10106.3,3169.29)
  Bottom Layer w5: R257.1@3322.83,666.85 v2(3322.83,700.79) R253.1@3322.83,764.25
UBA.SOFT.TMS: R254.1 R258.1 U5.Y18 | length 9001.7
  Top Layer w7.87: U5.Y18@10165.35,3188.98 v1(10185.04,3169.29)
  MidLayer3 w5: v2(3480.32,700.79) 3503.93,724.41 3579.66,724.41 3637.76,666.31 3637.76,446.11 3839.77,244.1 4417.09,244.1 4606.07,433.07 6928.67,433.07 7708.66,1213.06 7708.66,1485.21 7959.67,1736.22 8685.04,1736.22 9015.75,2066.93 9015.75,2397.64 9291.34,2673.23 10092.95,2673.23 10224.41,2804.69 10224.41,2972.44 10204.73,2992.13 10204.73,3149.6 v1(10185.04,3169.29)
  Bottom Layer w5: R258.1@3480.32,666.85 v2(3480.32,700.79) R254.1@3480.32,764.25
UBB#.DETECT: HDR2.10 R279.2 | length 347.9
  Bottom Layer w5: HDR2.10@4353.54,374.02 4433.07,374.02 4464.57,405.51 R279.2@4464.57,622.52
  Bottom Layer w10: R279.2@4464.57,622.52 R279.2@4471.42,622.52
UBB#.HARD.TCK: HDR2.3 R269.2 | length 173.9
  Bottom Layer w5: R269.2@3992.13,622.52 3992.13,535.43 HDR2.3@4053.54,474.02
UBB#.HARD.TDI: HDR2.1 R266.2 | length 165.1
  Bottom Layer w5: R266.2@3913.39,622.52 3913.39,514.17 HDR2.1@3953.54,474.02
UBB#.HARD.TDO: HDR2.2 R267.2 | length 351.3
  Bottom Layer w5: R267.2@3834.65,622.52 3834.65,401.57 3862.2,374.02 HDR2.2@3953.54,374.02
UBB#.HARD.TMS: HDR2.4 R268.2 | length 281.8
  Bottom Layer w5: HDR2.4@4053.54,374.02 4102.36,422.83 4102.36,507.87 4070.87,539.37 R268.2@4070.87,622.52
UBB#.SOFT.TCK: HDR2.7 R277.2 | length 170.7
  Bottom Layer w5: HDR2.7@4253.54,474.02 4307.09,527.56 R277.2@4307.09,622.52
UBB#.SOFT.TDI: HDR2.5 R274.2 | length 155.7
  Bottom Layer w5: R274.2@4149.61,622.52 4149.61,477.95 HDR2.5@4153.54,474.02
  Bottom Layer w11.81: R274.2@4149.61,622.52 R274.2@4153.54,618.58
UBB#.SOFT.TDO: HDR2.6 R275.2 | length 279.5
  Bottom Layer w5: HDR2.6@4153.54,374.02 4204.72,425.2 4204.72,507.87 4228.35,531.5 R275.2@4228.35,622.52
UBB#.SOFT.TMS: HDR2.8 R276.2 | length 381.5
  Bottom Layer w5: HDR2.8@4253.54,374.02 4303.53,424 4392.5,424 4417.32,448.82 4417.32,496.06 4385.83,527.56 R276.2@4385.83,622.52
UBB.DETECT: R278.1 R279.1 U5.P7 | length 7128.2
  Top Layer w7.87: v5@9712.6,3405.51 U5.P7@9732.28,3425.2
  MidLayer3 w5: v2(4464.57,700.79) 4543.31,622.05 6850.39,622.05 7519.69,1291.34 7519.69,1563.48 7881.4,1925.2 8622.05,1925.2 8811.02,2114.17 8811.02,2704.49 9345.51,3238.98 9489.5,3238.98 9502,3251.48 9502,3359.96 9527.87,3385.83 9692.91,3385.83 v5@9711.61,3404.53
  Bottom Layer w11.81: R279.1@4464.57,664.88 v2(4464.57,700.79) R278.1@4464.57,764.25
  other v5: 9710.63,3405.51
UBB.HARD.TCK: R265.1 R269.1 U5.Y7 | length 7495.2
  Top Layer w7.87: v1(9712.6,3169.29) U5.Y7@9732.28,3188.98
  MidLayer3 w5: v2(3992.13,698.82) 4139.76,551.18 6879.75,551.18 7590.55,1261.99 7590.55,1534.13 7910.75,1854.33 8645.67,1854.33 8881.89,2090.55 8881.89,2675.14 9356.36,3149.61 9413.39,3149.61 9433.07,3149.61 9692.91,3149.61 v1(9712.6,3169.29)
  Bottom Layer w5: R269.1@3992.13,664.88 v2(3992.13,698.82) R265.1@3992.13,764.25
UBB.HARD.TDI: R262.1 R266.1 U5.Y8 | length 7658.8
  Top Layer w7.87: v1(9751.97,3169.29) U5.Y8@9771.65,3188.98
  MidLayer3 w5: v2(3913.39,698.82) 4072.83,539.37 6884.64,539.37 7602.36,1257.09 7602.36,1529.24 7915.64,1842.52 8649.61,1842.52 8893.7,2086.61 8893.7,2670.25 9227.87,3004.42 ; 9213.58,2990.12 9333.69,3110.24 9413.39,3110.24 9433.07,3110.24 9720.47,3110.24 9732.28,3122.05 9732.28,3149.6 v1(9751.97,3169.29)
  Bottom Layer w5: R266.1@3913.39,664.88 v2(3913.39,698.82) R262.1@3913.39,764.25
UBB.HARD.TDO: R263.1 R267.1 U5.Y9 | length 7814.2
  Top Layer w7.87: v1(9791.34,3169.29) U5.Y9@9811.02,3188.98
  MidLayer3 w5: v2(3834.65,698.82) 4005.91,527.56 6889.53,527.56 7614.17,1252.2 7614.17,1524.35 7920.54,1830.71 8653.54,1830.71 8905.51,2082.68 8905.51,2665.36 9338.58,3098.43 9413.39,3098.43 9433.07,3098.43 9507.87,3098.43 9535.43,3070.87 9763.78,3070.87 9771.65,3078.74 9771.65,3149.6 v1(9791.34,3169.29)
  Bottom Layer w5: R267.1@3834.65,664.88 v2(3834.65,698.82) R263.1@3834.65,764.25
UBB.HARD.TMS: R264.1 R268.1 U5.W7 | length 7423.5
  Top Layer w7.87: v1(9712.6,3208.66) U5.W7@9732.28,3228.35
  MidLayer3 w5: v2(4070.87,698.82) 4206.69,562.99 6874.86,562.99 7578.74,1266.88 7578.74,1539.02 7905.86,1866.14 8641.73,1866.14 8870.08,2094.49 8870.08,2680.03 9379.02,3188.98 9409.45,3188.98 9433.07,3188.98 9692.91,3188.98 v1(9712.6,3208.66)
  Bottom Layer w5: R268.1@4070.87,664.88 v2(4070.87,698.82) R264.1@4070.87,764.25
UBB.SOFT.TCK: R273.1 R277.1 U5.T7 | length 7235.6
  Top Layer w7.87: v1(9712.6,3326.77) U5.T7@9732.28,3346.46
  MidLayer3 w5: v2(4307.09,700.79) 4409.45,598.43 6860.18,598.43 7543.31,1281.55 7543.31,1553.7 7891.18,1901.58 8629.92,1901.58 8834.65,2106.3 8834.65,2694.71 9358.91,3218.98 9497.78,3218.98 9522,3243.2 9522,3285.78 9543.31,3307.09 9696.85,3307.09 v1(9712.6,3326.77)
  Bottom Layer w5: R277.1@4307.09,664.88 v2(4307.09,700.79) R273.1@4307.09,764.25
UBB.SOFT.TDI: R270.1 R274.1 U5.V7 | length 7351.8
  Top Layer w7.87: v1(9712.6,3248.03) U5.V7@9732.28,3267.72
  MidLayer3 w5: v2(4149.61,698.82) 4273.62,574.8 6869.96,574.8 7566.93,1271.77 7566.93,1543.92 7900.97,1877.95 8637.8,1877.95 8858.27,2098.43 8858.27,2684.92 9372.32,3198.98 9506.07,3198.98 9535.43,3228.35 9692.91,3228.35 v1(9712.6,3248.03)
  Bottom Layer w5: R274.1@4149.61,664.88 v2(4149.61,698.82) R270.1@4149.61,764.25
UBB.SOFT.TDO: R271.1 R275.1 U5.U7 | length 7290.8
  Top Layer w7.87: v1(9712.6,3287.4) U5.U7@9732.28,3307.09
  MidLayer3 w5: v2(4228.35,700.79) 4342.52,586.62 6865.07,586.62 7555.12,1276.66 7555.12,1548.81 7896.08,1889.76 8633.86,1889.76 8846.46,2102.36 8846.46,2689.82 9365.62,3208.98 9501.92,3208.98 9532,3239.05 9532,3255.72 9544,3267.72 9692.91,3267.72 v1(9712.6,3287.4)
  Bottom Layer w5: R275.1@4228.35,664.88 v2(4228.35,700.79) R271.1@4228.35,764.25
UBB.SOFT.TMS: R272.1 R276.1 U5.R7 | length 7188.9
  Top Layer w7.87: v1(9712.6,3366.14) U5.R7@9732.28,3385.83
  MidLayer3 w5: v2(4385.83,700.79) 4476.38,610.24 6855.29,610.24 7531.5,1286.45 7531.5,1558.59 7886.29,1913.39 8625.98,1913.39 8822.83,2110.24 8822.83,2699.6 9352.21,3228.98 9493.64,3228.98 9512,3247.34 9512,3334.83 9523.62,3346.46 9692.91,3346.46 v1(9712.6,3366.14)
  Bottom Layer w5: R276.1@4385.83,664.88 v2(4385.83,700.79) R272.1@4385.83,764.25
UGCLK0: U5.B13
UGCLK1: U5.A13
UGCLK2: U5.C14 | length 27.8
  Top Layer w7.87: U5.C14@10007.87,3858.27 v1(10027.56,3877.95)
UGCLK3: U5.B14 | length 27.8
  Top Layer w5: U5.B14@10007.87,3897.64 v1(10027.56,3917.32)
UGCLK4: U5.AE14
UIO.IO0: HDR_B1.7 UH1.2 | length 1478.4
  Top Layer w7.87: UH1.2@5866.14,351.97 5866.14,403.94 6084.25,622.05 6450.77,622.05 6582.68,753.96 HDR_B1.7@6582.68,1318.9
UIO.IO1: HDR_B1.9 UH1.3 | length 1575.9
  Top Layer w7.87: UH1.3@5966.14,251.97 5916.14,301.97 5916.14,401.18 6118.5,603.54 6458.43,603.54 6614.17,759.29 HDR_B1.9@6614.17,1318.9
UIO.IO2: HDR_B1.11 UH1.4 | length 1433.3
  Top Layer w7.87: UH1.4@5966.14,351.97 5966.14,400.79 6150.39,585.04 6466.1,585.04 6641.73,760.68 6641.73,1251.97 6645.67,1255.91 HDR_B1.11@6645.67,1318.9
UIO.IO3: HDR_B1.13 UH1.5 | length 1532.6
  Top Layer w7.87: UH1.5@6066.14,251.97 6016.14,301.97 6016.14,401.18 6181.5,566.54 6473.76,566.54 6661.42,754.19 6661.42,1240.16 6677.16,1255.91 HDR_B1.13@6677.16,1318.9
UIO.IO4: HDR_B1.15 UH1.6 | length 1390.1
  Top Layer w7.87: UH1.6@6066.14,351.97 6066.14,400.79 6213.39,548.03 6481.42,548.03 6681.1,747.71 6681.1,1228.35 6708.66,1255.91 HDR_B1.15@6708.66,1318.9
UIO.IO5: HDR_B1.17 UH1.7 | length 1491.2
  Top Layer w7.87: UH1.7@6166.14,251.97 6116.14,301.97 6116.14,401.18 6243.7,528.74 6491.32,528.74 6700.79,738.21 6700.79,1216.54 6740.16,1255.91 HDR_B1.17@6740.16,1318.9
UIO.IO6: HDR_B1.19 UH1.8 | length 1348.3
  Top Layer w7.87: UH1.8@6166.14,351.97 6166.14,400.79 6275.98,510.63 6498.82,510.63 6720.47,732.28 6720.47,1204.73 6771.65,1255.91 HDR_B1.19@6771.65,1318.9
UIO.IO7: HDR_B1.21 UH1.9 | length 1446.1
  Top Layer w7.87: UH1.9@6266.14,251.97 6216.14,301.97 6216.14,401.18 6307.09,492.13 6503.94,492.13 6740.16,728.35 6740.16,1192.91 6803.15,1255.91 HDR_B1.21@6803.15,1318.9
UIO.IO8: HDR_B1.23 UH1.10 | length 1309
  Top Layer w7.87: UH1.10@6266.14,351.97 6266.14,408.67 6329.92,472.44 6511.81,472.44 6759.84,720.47 6759.84,1181.1 6834.65,1255.91 HDR_B1.23@6834.65,1318.9
UIO.IO9: HDR_B1.25 UH1.11 | length 1400.1
  Top Layer w7.87: UH1.11@6366.14,251.97 6316.14,301.97 6316.14,393.7 6375.2,452.76 6519.69,452.76 6779.53,712.6 6779.53,1169.29 6866.14,1255.91 HDR_B1.25@6866.14,1318.9
UIO.IO10: HDR_B1.27 UH1.12 | length 1258.6
  Top Layer w7.87: UH1.12@6366.14,351.97 6366.14,393.7 6405.51,433.07 6527.56,433.07 6799.21,704.73 6799.21,1157.48 6897.64,1255.91 HDR_B1.27@6897.64,1318.9
UIO.IO11: HDR_B1.29 UH1.13 | length 1351.6
  Top Layer w7.87: UH1.13@6466.14,251.97 6416.14,301.97 6416.14,381.89 6447.64,413.39 6535.43,413.39 6818.9,696.85 6818.9,1145.67 6929.13,1255.91 HDR_B1.29@6929.13,1318.9
UIO.IO12: HDR_B1.31 UH1.14 | length 1192.5
  Top Layer w7.87: UH1.14@6466.14,351.97 6507.87,393.7 6543.31,393.7 6838.58,688.98 6838.58,1141.73 6960.63,1263.78 HDR_B1.31@6960.63,1318.9
UIO.IO13: HDR_B1.33 UH1.15 | length 1917.9
  Top Layer w7.87: v4(6408.68,1373.45) 6428.93,1393.7 6984.25,1393.7 6992.13,1385.83 HDR_B1.33@6992.13,1318.9
  MidLayer1 w7.87: v4(6408.68,1373.45) 6457.26,1373.45 6615.26,1215.45 6615.26,301.09 UH1.15@6566.14,251.97
UIO.IO14: HDR_B1.35 UH1.16 | length 1416.5
  Top Layer w7.87: UH1.16@6566.14,351.97 6631.5,417.32 6842.52,417.32 6905.51,480.32 6988.19,480.32 7129.92,622.05 7129.92,1149.61 7023.62,1255.91 HDR_B1.35@7023.62,1318.9
UIO.IO15: HDR_B1.37 UH1.17 | length 1523.3
  Top Layer w7.87: 6615.35,304.33 6615.35,367.32 6645.67,397.64 6850.39,397.64 6897.64,444.88 6909.45,456.69 7007.87,456.69 7149.61,598.43 7149.61,1161.42 7125.88,1185.14 7055.12,1255.91 HDR_B1.37@7055.12,1318.9 ; 6616.14,301.97 UH1.17@6666.14,251.97
UIO.IO16: HDR_B1.39 UH1.18 | length 1411.9
  Top Layer w7.87: UH1.18@6666.14,351.97 6714.96,303.15 6787.4,303.15 6917.32,433.07 7023.62,433.07 7169.29,578.74 7169.29,1173.23 7086.61,1255.91 HDR_B1.39@7086.61,1318.9
UIO.IO17: HDR_B1.41 UH1.19 | length 1341.5
  Top Layer w7.87: UH1.19@6766.14,251.97 6923.62,409.45 7043.31,409.45 7188.98,555.12 7188.98,1185.04 7118.11,1255.91 HDR_B1.41@7118.11,1318.9
UIO.IO18: HDR_B1.43 UH2.2 | length 1014.2
  Top Layer w7.87: HDR_B1.43@7149.61,1318.9 7149.61,1255.91 7208.66,1196.85 7208.66,555.12 7263.78,500 UH2.2@7263.78,351.97
UIO.IO19: HDR_B1.45 UH2.3 | length 1142.6
  Top Layer w7.87: HDR_B1.45@7181.1,1318.9 7181.1,1255.91 7228.35,1208.66 7228.35,580.51 7313.78,495.07 7313.78,301.97 UH2.3@7363.78,251.97